# Altium PCB Watersensor.PcbDoc
Units mm, origin at the board's own origin, x right, y up, seen from the top; angles counter-clockwise.
Board outline 124.21 x 50.04 mm, 2 copper layers (Top Layer, Bottom Layer); 22 components, 15 nets, 108 pads, 8 vias.
Unrouted connection lines stored in the file: 11.
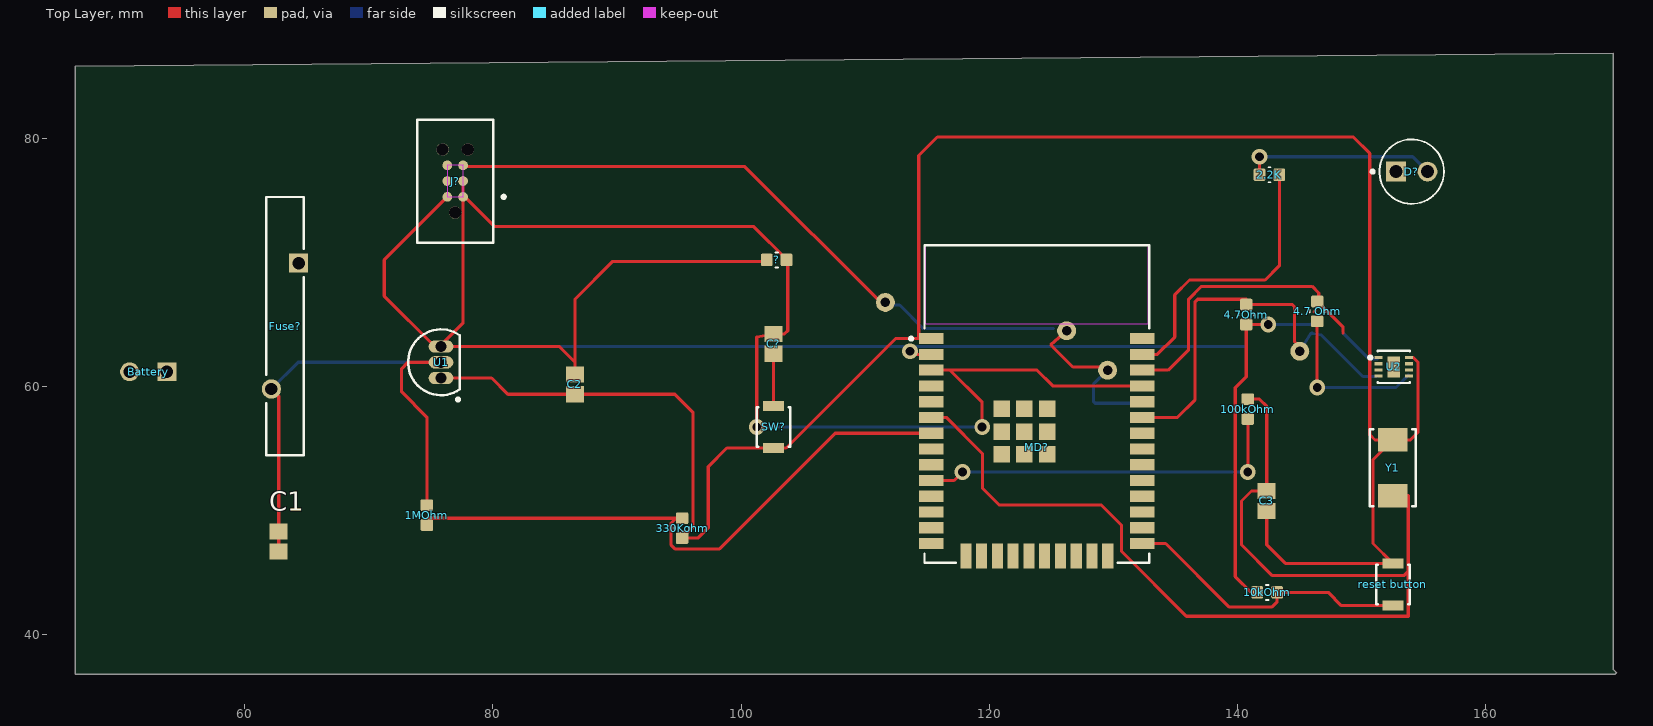
[diagram p0: Top Layer view]
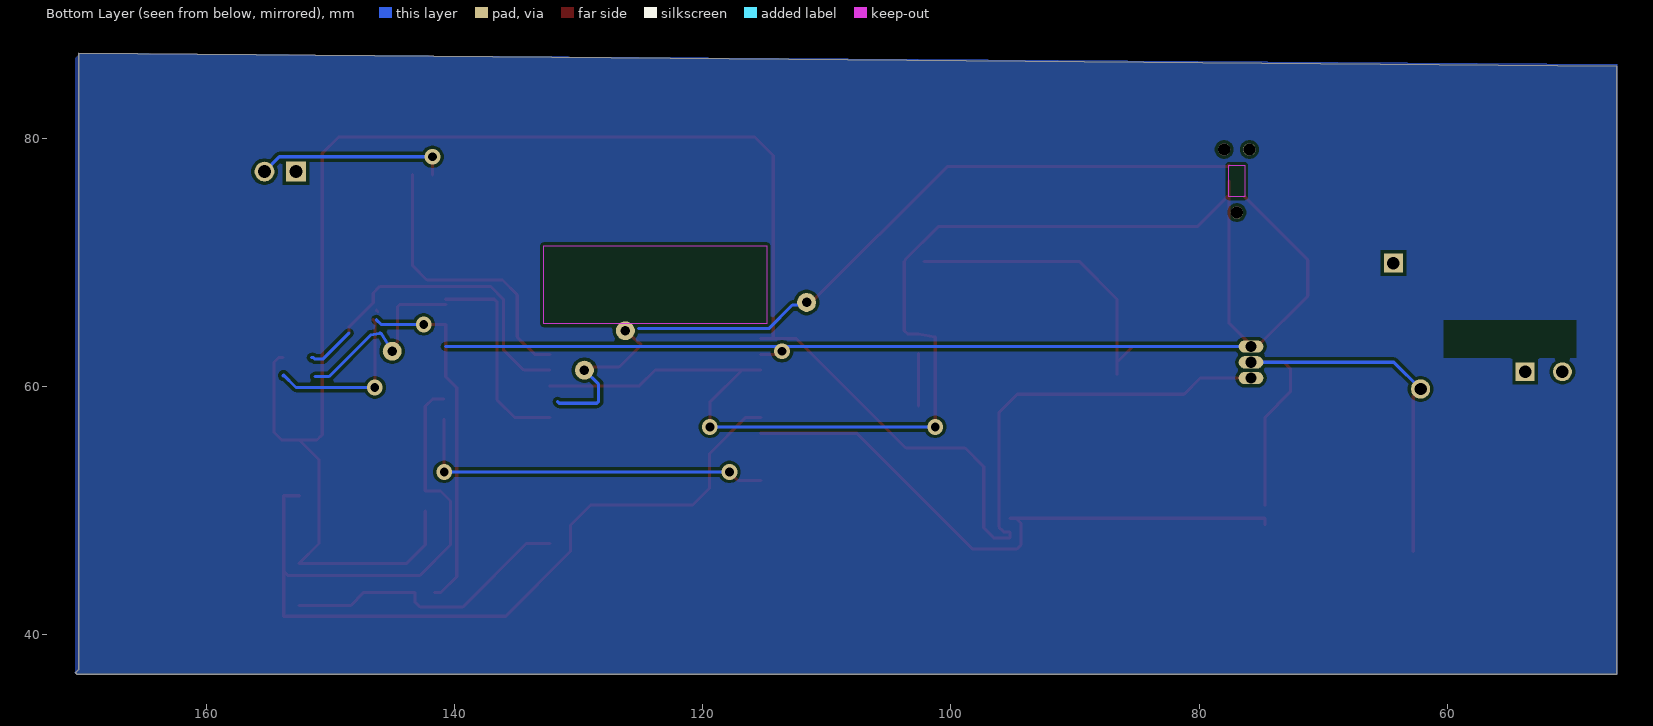
[diagram p1: Bottom Layer view, seen from below]
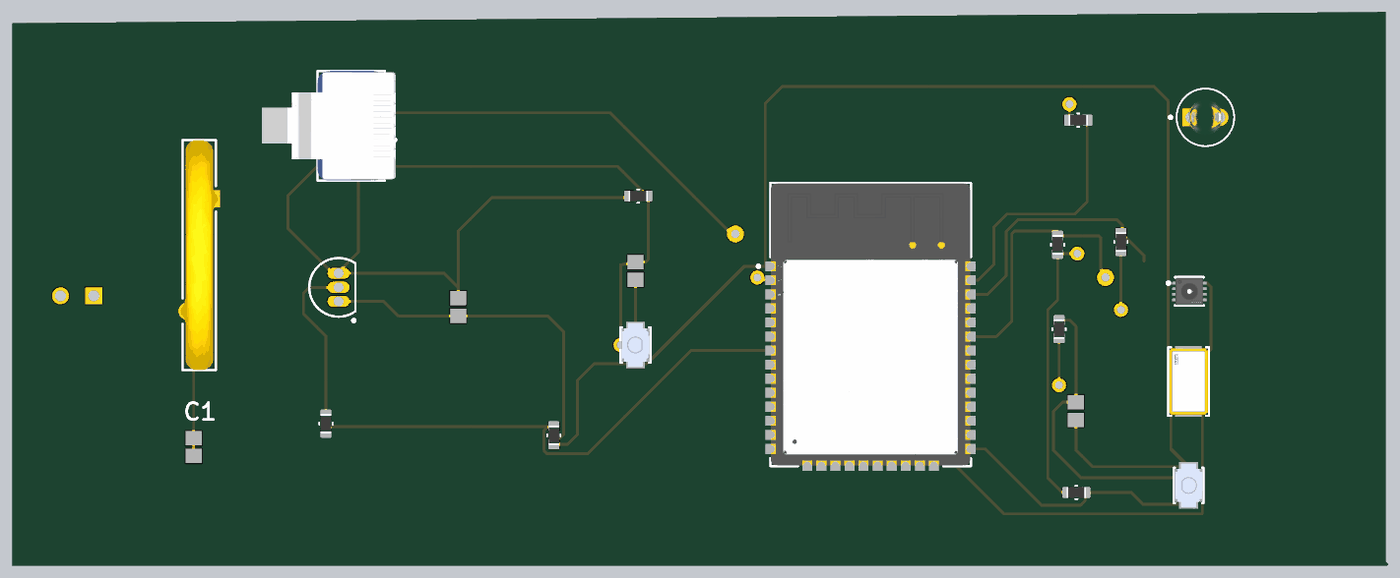
[diagram p2: 3D render of the assembled board from above, using the file's embedded part models]

## Layer stack, top to bottom
Top Solder: solder mask 0.0102, Solder Resist, Dk 3.5
Top Layer: signal copper 0.0356
Dielectric 1: dielectric 0.32, FR-4, Dk 4.8
Bottom Layer: signal copper 0.0356
Bottom Solder: solder mask 0.0102, Solder Resist, Dk 3.5

## Board outline
46.355,85.852 46.355,36.83 170.434,36.83 170.561,36.957 170.307,37.211 170.307,86.868

## Design rules (kind name [scope] priority, off if disabled: settings)
Clearance [All] p1: gap=0.254 ignorepadtopadclearanceinfootprint=FALSE
PolygonConnect [All] p1: connectstyle=Relief reliefconductorwidth=0.254 reliefentries=4 polygonreliefangle="90 Angle" airgapwidth=0.254
RoutingVias [All] p1: holewidth=0.711 width=1.27 viastyle="Through Hole" minholewidth=0.711 minwidth=1.27 maxholewidth=0.711 maxwidth=1.27
SolderMaskExpansion [All] p1: expansion=0.102 istentingtop=FALSE
SupplyNets "Schematic Supply Nets" [InNet('GND')] p1: voltage=0.000
Width [All] p1: maxlimit=0.254 minlimit=0.254 preferedwidth=0.254
30 further rules are at their usual default settings.

## Classes and differential pairs
component class Debug: J?

## Components (designator, comment, footprint, x,y, rotation, side; value= is the part's Value field where it differs from the comment)
1MOhm "" RESC_0603(1608)_020(0.5) 74.676,49.657 r90 top
2.2K "" RESC_0603(1608)_020(0.5) 142.583,77.089 r180 top
"4.7 Ohm" "" RESC_0603(1608)_020(0.5) 146.431,66.078 r90 top
4.7Ohm "" RESC_0603(1608)_020(0.5) 140.716,65.824 r90 top
10kOhm "" RESC_0603(1608)_020(0.5) 142.405,43.434 r180 top
100kOhm "" RESC_0603(1608)_020(0.5) 140.843,58.204 r270 top
330Kohm "" RESC_0603(1608)_020(0.5) 95.25,48.603 r90 top
? "" RESC_0603(1608)_020(0.5) 102.87,70.231 r180 top
Battery "Comment" BATTERY_2PIN 53.721,61.214 r0 top
C1 "1uf Capacitor" CAPC2013X140X50NL20T25 62.738,47.536 r90 top
C2 "1uf Capacitor" CAPC2013X140X50NL20T25 86.614,60.198 r90 top
C3 "1uf Capacitor" CAPC2013X140X50NL20T25 142.367,50.8 r90 top
C? "1uf" CAPC2013X140X50NL20T25 102.616,63.462 r90 top
D? "LED" FP-6_544-5255_01-4-MFG 154.051,77.343 r0 top
Fuse? "Fuse" FP-RXEF250-MFG 63.246,64.897 r270 top value=0.05-0.13Ω
J? "Debug" FP-TC2030-MCP-NL-MFG 76.962,76.581 r90 top
MD? "ESP32-WROOM-32" FP-ESP32-WROOM-32-MFG 123.834,58.621 r0 top
"reset button" "Reset Button" FP-B3U-1000P-MFG 152.527,44.069 r90 top
SW? "Reset Button" FP-B3U-1000P-MFG 102.616,56.769 r270 top
U1 "LDO" TO-92-TO3 75.819,61.976 r0 top
U2 "Humidity sensor" FP-SHT31-DIS-B2_5KS-MFG 152.609,61.607 r0 top
Y1 "Water detection" FP-ECX-64A-MFG 152.527,53.467 r90 top

## Footprints (in the part's own frame and the unit in brackets; to place one, negate y for a bottom-side part, rotate by r counter-clockwise, add the part's x,y. Pads: shape width x height; smd on the part's side, far side on the other; paste and mask are expansions set on the pad)
BATTERY_2PIN [mil] "2 PIN battery connection (GND/ BAT+) Li-ion 3.0 - 4.2V"
  rect 60x60 hole 39.37: 1(0,0)
  round 60 hole 39.37: 2(-118.11,0)
CAPC2013X140X50NL20T25 [mm] "Chip Capacitor, 2-Leads, Body 2.00x1.25mm, IPC Medium Density"
  rect 1.3x1.45 smd: 1(-0.8,0) 2(0.8,0)
  body extent -1.1,-0.72 1.1,0.72, height 1.4
FP-6_544-5255_01-4-MFG [mm]
  rect 1.6x1.6 hole 1.05 paste-2539.97 mask+0: 1(-1.27,0)
  round 1.6 hole 1.05 paste-2539.97 mask+0: 2(1.27,0)
  silkscreen extent -3.27,-2.6 2.6,2.6, body extent -2.32,-2.32 2.32,2.32, height 0.25
FP-B3U-1000P-MFG [mm]
  rect 0.8x1.7 smd paste+0 mask+0: 1(-1.7,0) 2(1.7,0)
  silkscreen extent -1.6,-1.35 1.6,1.35, body extent -2.2,-1.45 2.2,1.45, height 0.25
FP-ECX-64A-MFG [mm]
  rect 1.9x2.4 smd paste+0 mask+0: 1(-2.25,0) 2(2.25,0)
  silkscreen extent -3.1,-1.85 3.1,1.85, body extent -3.3,-1.95 3.3,1.95, height 0.25
FP-ESP32-WROOM-32-MFG [mm]
  rect 2x0.9 smd paste+0 mask+0: 1(-8.5,5.26) 2(-8.5,3.99) 3(-8.5,2.72) 4(-8.5,1.45) 5(-8.5,0.18) 6(-8.5,-1.09) 7(-8.5,-2.36) 8(-8.5,-3.63) 9(-8.5,-4.9) 10(-8.5,-6.17) 11(-8.5,-7.44) 12(-8.5,-8.71) 13(-8.5,-9.98) 14(-8.5,-11.25) 25(8.5,-11.25) 26(8.5,-9.98) 27(8.5,-8.71) 28(8.5,-7.44) 29(8.5,-6.17) 30(8.5,-4.9) 31(8.5,-3.63) 32(8.5,-2.36) 33(8.5,-1.09) 34(8.5,0.18) 35(8.5,1.45) 36(8.5,2.72) 37(8.5,3.99) 38(8.5,5.26)
  rect 0.9x2 smd paste+0 mask+0: 15(-5.715,-12.25) 16(-4.445,-12.25) 17(-3.175,-12.25) 18(-1.905,-12.25) 19(-0.635,-12.25) 20(0.635,-12.25) 21(1.905,-12.25) 22(3.175,-12.25) 23(4.445,-12.25) 24(5.715,-12.25)
  rect 1.33x1.33 smd paste+0 mask+0: 39(-2.835,-4.075) 39(-2.835,-2.24) 39(-2.835,-0.405) 39(-1,-4.075) 39(-1,-2.24) 39(-1,-0.405) 39(0.835,-4.075) 39(0.835,-2.24) 39(0.835,-0.405)
  Keep-Out Layer region: -9,6.45 9,6.45 9,12.75 -9,12.75
  Keep-Out Layer region: -9,6.45 9,6.45 9,12.75 -9,12.75
  silkscreen extent -10.25,-12.8 9.05,12.8, body extent -9.6,-13.35 9.6,12.9, height 0.25
FP-RXEF250-MFG [mm]
  rect 1.55x1.55 hole 1 paste-2539.97 mask+0: 1(-5.075,1.095)
  round 1.55 hole 1 paste-2539.97 mask+0: 2(5.075,-1.095)
  silkscreen extent -10.4,-1.5 10.4,1.5, body extent -10.5,-1.97 10.5,1.97, height 0.25
FP-SHT31-DIS-B2_5KS-MFG [mm]
  rect 0.65x0.25 smd paste-1000 mask+0: 1(-1.225,0.75) 2(-1.225,0.25) 3(-1.225,-0.25) 4(-1.225,-0.75) 5(1.225,-0.75) 6(1.225,-0.25) 7(1.225,0.25) 8(1.225,0.75)
  rect 1x1.7 smd paste-1000 mask+0: 9(0,0)
  silkscreen extent -2.02,-1.3 1.3,1.3, body extent -1.65,-1.4 1.65,1.4, height 0.25
FP-TC2030-MCP-NL-MFG [mil]
  round 30.98 smd paste-39370.1 mask+0: 1(-50,-25) 2(-50,25) 3(0,-25) 4(0,25) 5(50,-25) 6(50,25)
  round 39.02 hole 39.02 unplated paste-99999 mask+0: ""(-100,0) ""(100,-40) ""(100,40)
  Keep-Out Layer region: -50,-25 50,-25 50,25 -50,25
  silkscreen extent -195,-159 195,120, body extent -199,-124 199,124, height 10
RESC_0603(1608)_020(0.5) [mm] "Resistor, 0603 (1608) x 020 (0.5)"
  rrect25% 0.95x1 smd mask+0.05: 1(-0.8,0) 2(0.8,0)
  silkscreen extent -0.1,-0.6 0.1,0.6, body extent -0.87,-0.48 0.87,0.48, height 0.5
TO-92-TO3 [mm] "TO, Flat Index; 3 In-Line, Axial Leads; Body Dia. 4.8mm; Leads 0.56 x 0.53 mm (max)"
  oval 2x1 hole 0.9: 1(0,-1.27) 2(0,0) 3(0,1.27)
  silkscreen extent -2.65,-3.13 1.52,2.65, body extent -2.65,-2.66 1.52,2.66, height 5.33

## Part data
1MOhm 2.2K "4.7 Ohm" 4.7Ohm 10kOhm 100kOhm 330Kohm ?: library part CMP-00408-1, "Resistor, 1 kOhm, 1%, 1/10W, 0603", Case=0603, Manufacturer=Various, Max Temperature=155°C, Min Temperature=-55°C, Power=100mW, Resistance=1k, Tolerance=1%, AEC-Q200=Y, Composition="Thin Film", Features="Automotive AEC-Q200", Height=500µm, Mounting=SMT
C1 C2 C3 C?: library part CMP-2007-04663-1, Manufacturer="AVX Interconnect / Elco", Part Number=0805YD105MAT2A
D?: library part CMP-02520-000017-1, "LED GREEN DIFFUSED T-1 T/H", Case/Package=T, Color=Green, Forward Current=7mA, Forward Voltage=2.4V, Max Operating Temperature=100°C, Min Operating Temperature=-40°C, Power Dissipation=20mW, Reverse Voltage=20V, Test Current=2mA, Depth=3.2mm, Dominant Wavelength=575nm, Length=3.2mm, Lens Style=Diffused, Luminous Intensity=2mcd, Mount="Through Hole", Number of Elements=1, Number of LEDs=1, Number of Pins=2, Packaging="Tape and Reel", Radiation Hardening=No, RoHS Compliant=No, Viewing Angle=50°
Fuse?: library part CMP-08606-000004-1, "PTC RESET FUSE 72V 2.5A RADIAL", Ambient Temperature Range High=+85°C, Ambient Temperature Range Low=-40°C, Current Rating=40A, Hold Current=2.5A, Manufacturer=Littelfuse, Manufacturer Part Number=RXEF250, Package=0, Resistance=0.05-0.13Ω, Temperature="-40°C to +85°C", Trip Current=5A, Voltage Rating=72V, Automotive=No, Category=Fuse, ComponentLink2Description=Datasheet, ComponentLink2URL=https://www.littelfuse.com/~/media/electronics/datasheets/resettable_ptcs/littelfuse_ptc_radial_leaded_rxef_datasheet.pdf.pdf, Device Class L1="Circuit Protection", Device Class L2="PTC Resettable Fuses", Device Class L3=unset, Digikey Description="PTC RESET FUSE 72V 2.5A RADIAL", Height=25.4mm, Lead Free=Yes, Octopart=https://octopart.com/rxef250-littelfuse-74215928, RoHS=TRUE, Temperature Range High=+85°C, Temperature Range Low=-40°C, Trip Time=15.6s
J?: library part CMP-205963-000002-1, "CABLE TAG-CONNECT IN-CIRCUIT", Package Quantity=1, Lead Free="Lead Free", Reach SVHC Compliant=Yes, RoHS Compliant=Yes, Series=-
MD?: library part CMP-194065-000008-1, "RX TXRX MOD WIFI SURFACE MOUNT", Case/Package=SMD/SMT, Frequency=2.5GHz, Max Operating Temperature=85°C, Min Operating Temperature=-40°C, Operating Supply Voltage=3.6V, Package Quantity=550, Data Rate=150Mbps, Mount="Surface Mount", Packaging="Cut Tape", Sensitivity=-98dBm, Weight=0.088185oz
"reset button" SW?: library part CMP-2100-03586-2, "SWITCH TACTILE SPST-NO 0.05A 12V", Contact Current Rating=50mA, Contact Resistance=100mR, Insulation Resistance=100MR, Max Operating Temperature=70°C, Max Voltage Rating (DC)=12V, Min Operating Temperature=-25°C, Operating Force=1.5N, Package Quantity=1, Ratings="Dust Proof", Actuator Length=0.4mm, Actuator Type=Standard, Contact Material=Silver, Current Rating=50mA, Depth=2.5mm, Electrical Life=200000Cycles, Height=1.2mm, Illumination Type=Non-Illuminated, Lead Free="Lead Free", Length=4mm, Max Current Rating=50mA, Mechanical Life=200000Cycles, Mount="Surface Mount", Orientation=Straight, Packaging="Tape and Reel", Switch Function=Off-Mom, Switch Travel=0.15mm, Termination=SMD/SMT, Throw Configuration=SPST, Voltage Rating (DC)=12V, Weight=0.000776oz, Width=3mm
U1: library part CMP-0136-00007-1, "Low Quiescent Current LDO, 3-Pin TO-92, Extended TemperatureBAG", DatasheetVersion="revB, Feb-2007", PackageDescription="3-Lead Plastic Transistor Outline (TO) [TO-92]", PackageReference=TO-92-TO3, PackageVersion="revBB, Aug-2009"
U2: library part CMP-144040-000009-1, "SENSOR HUMID/TEMP 5V I2C 2% SMD", RoHS Compliant=Yes
Y1: library part CMP-40224-000026-1, "CRYSTAL 25.0000MHZ 18PF SMD", Case/Package=SMD/SMT, ESR (Equivalent Series Resistance)=40R, Frequency=25MHz, Frequency Stability=30ppm, Frequency Tolerance=20ppm, Load Capacitance=18pF, Max Operating Temperature=85°C, Min Operating Temperature=-40°C, Height=0.043inch, Length=0.236inch, Mount="Surface Mount", Packaging="Cut Tape", Width=0.138inch

## Free pads (board coordinates)
  round 1.524 hole 0.762: 2(145.034,62.865) 3(111.633,66.802) 4(126.238,64.516) 5(129.54,61.341)

## Via types
v1: diameter 1.27, hole 0.711, Top Layer to Bottom Layer, 8 vias

## Nets (pads, with @x,y where several pads share a name; then routed paths per layer and width w, separated by ;. In a path a pad name is that pad's centre, name@x,y a point inside that pad or via, vN(x,y) a via of type N, cw(c..) or ccw(c..) an arc to the next point about the centre after c; other vN are vias at no path point)
GND: 330Kohm.1 "reset button.2" C2.1 C3.1 J?.3 MD?.1 SW?.2 U1.1 U2.7 U2.8 Y1.2 | length 186.2
  Top Layer w0.254: U1.1 79.896,60.706 81.204,59.398 C2.1 94.653,59.398 96.139,57.912 96.139,48.692 95.758,48.311 95.25,48.311 330Kohm.1 96.52,47.803 97.358,48.641 97.358,53.569 98.859,55.069 SW?.2 103.632,55.069 112.444,63.881 114.325,63.881 ; 75.946,63.5 77.597,65.151 J?.3 ; MD?.1 114.325,63.881 ; C3.1 142.367,47.269 143.867,45.769 152.527,45.769 150.927,47.369 150.927,54.117 Y1.2 ; U2.8 154.178,62.357 154.559,61.976 154.559,56.337 153.939,55.717 Y1.2 ; 114.325,63.881 114.325,78.638 115.824,80.137 149.352,80.137 150.673,78.816 150.673,56.134 151.09,55.717 Y1.2
Net1MOhm_2: 1MOhm.2 C1.1 C1.2 Fuse?.2 U1.2 | length 43.1
  Top Layer w0.254: Fuse?.2 62.738,59.235 C1.2 C1.1 ; 1MOhm.2 74.676,57.556 72.644,59.588 72.644,61.468 73.152,61.976 U1.2
  Bottom Layer w0.254: Fuse?.2 64.305,61.976 U1.2
Net2.2K_1: 2.2K.1 MD?.37 | length 23.3
  Top Layer w0.254: MD?.37 133.553,62.611 134.95,64.008 134.95,67.412 136.144,68.605 142.24,68.605 143.383,69.748 2.2K.1
Net2.2K_2: 2.2K.2 D?.2 | length 15.5
  Top Layer w0.254: 2.2K.2 v1(141.783,78.537)
  Bottom Layer w0.254: v1(141.783,78.537) 154.127,78.537 D?.2
"Net4.7 Ohm_1": 4.7Ohm.1 10kOhm.2 "4.7 Ohm.1" ?.2 C2.2 J?.2 MD?.2 U1.3 U2.5 | length 160
  Top Layer w0.254: J?.2 71.247,70.231 71.247,67.31 75.311,63.246 U1.3 85.344,63.246 86.614,61.976 ; C2.2 86.614,61.976 ; ?.2@102.159,70.104 102.07,70.104 89.662,70.104 86.614,67.056 86.614,61.976 ; v1(113.614,62.865) 113.868,62.611 MD?.2 ; 10kOhm.2 141.097,43.434 139.827,44.704 139.827,59.919 140.716,60.808 4.7Ohm.1 v1(142.494,65.024) ; v1(146.431,59.944) 146.431,65.278 146.558,65.405
  Bottom Layer w0.254: U1.3 v1@113.233,63.246 ; v1(113.614,62.865) v1@113.233,63.246 ; 140.716,63.246 v1@113.233,63.246 ; v1(142.494,65.024) 145.923,65.024 146.304,65.405 ; v1(146.431,59.944) 152.781,59.944 153.797,60.96 153.834,60.857
"Net4.7 Ohm_2": "4.7 Ohm.2" MD?.36 U2.1 | length 27.6
  Top Layer w0.254: MD?.36 134.417,61.341 136.068,62.992 136.068,67.056 137.109,68.097 146.025,68.097 146.558,67.564 146.558,66.776 148.523,64.811 148.523,64.329
  Bottom Layer w0.254: 148.523,64.329 150.622,62.23 151.257,62.23 151.384,62.357 151.511,62.357
Net4.7Ohm_2: 4.7Ohm.2 MD?.33 pad.2 U2.4 | length 33.1
  Top Layer w0.254: MD?.33 135.179,57.531 136.576,58.928 136.576,66.827 136.804,67.056 4.7Ohm.2@140.716,67.056 ; 4.7Ohm.2 144.443,66.624 144.592,66.475 144.592,63.649 145.034,63.207 pad.2
  Bottom Layer w0.254: pad.2 145.918,64.288 145.968,64.31 146.045,64.31 146.772,64.175 150.114,60.833 151.257,60.833
Net10kOhm_1: 10kOhm.1 "reset button.1" MD?.25 | length 23.7
  Top Layer w0.254: MD?.25 134.214,47.371 139.319,42.266 142.799,42.266 143.205,42.672 10kOhm.1 147.32,43.434 148.385,42.369 152.527,42.369
Net100kOhm_1: 100kOhm.1 C3.2 MD?.6 Y1.1 | length 88
  Top Layer w0.254: MD?.6 116.535,57.531 119.456,54.61 119.456,51.816 120.802,50.47 129.032,50.47 130.658,48.844 130.658,46.736 135.89,41.504 153.772,41.504 153.772,45.136 ; 100kOhm.1 141.783,59.004 142.367,58.42 C3.2 141.135,51.6 140.335,50.8 140.335,47.269 142.824,44.78 153.416,44.78 153.772,45.136 ; Y1.1 153.772,51.217 153.772,45.136
Net100kOhm_2: 100kOhm.2 MD?.10 | length 30.1
  Top Layer w0.254: MD?.10 117.17,52.451 v1(117.856,53.137) ; v1(140.843,53.137) 100kOhm.2
  Bottom Layer w0.254: v1(117.856,53.137) v1(140.843,53.137)
Net*_1: Fuse?.1
Net?_1: ?.1 C?.2 J?.1 J?.4 MD?.3 MD?.35 | length 85
  Top Layer w0.254: J?.1 77.741,75.311 80.146,72.906 101.02,72.906 103.67,70.256 ?.1 ; v1(101.27,56.769) 101.27,64.008 C?.2 103.505,64.262 103.759,64.516 ?.1@103.759,70.104 ; MD?.3 116.84,61.341 ; v1(119.431,56.769) 119.431,58.75 116.84,61.341 ; MD?.35 125.12,60.071 123.85,61.341 116.84,61.341
  Bottom Layer w0.254: v1(101.27,56.769) v1(119.431,56.769)
NetC?_1: C?.1 SW?.1 | length 4.2
  Top Layer w0.254: SW?.1 C?.1
NetJ?_5: J?.5 MD?.34 pad.3 pad.4 pad.5 | length 65.9
  Top Layer w0.254: J?.5 77.699,77.749 100.305,77.749 pad.3@111.252,66.802 ; pad.4 124.968,63.373 126.746,61.595 pad.5@129.413,61.595
  Bottom Layer w0.254: pad.3 111.845,66.59 112.776,66.59 114.676,64.69 125.175,64.69 ; pad.5 128.397,60.198 128.397,58.823 128.546,58.674 131.572,58.674 131.699,58.801
"Voltage Measurement": 1MOhm.1 330Kohm.2 MD?.7 | length 48.4
  Top Layer w0.254: 1MOhm.1 74.676,49.403 94.742,49.403 ; 330Kohm.2 94.742,49.403 ; MD?.7 107.594,56.261 98.273,46.939 94.666,46.939 94.361,47.244 94.361,49.022 94.742,49.403
pads on no net: Battery.1 Battery.2 D?.1 J?. J?.6 MD?.4 MD?.5 MD?.8 MD?.9 MD?.11 MD?.12 MD?.13 MD?.14 MD?.15 MD?.16 MD?.17 MD?.18 MD?.19 MD?.20 MD?.21 MD?.22 MD?.23 MD?.24 MD?.26 MD?.27 MD?.28 MD?.29 MD?.30 MD?.31 MD?.32 MD?.38 MD?.39 U2.2 U2.3 U2.6 U2.9
copper on no net: | length 0.2
  Top Layer w0.254: 146.177,66.04 146.304,66.167

## Polygon pours and split planes (outlines as drawn)
no net on Bottom Layer "NONET_L02_P004" (solid, pour order 4): 46.355,85.979 46.355,36.83 170.434,36.83 170.561,36.957 170.307,37.211 170.307,86.868
no net on Bottom Layer "NONET_L02_P003" (solid, pour order 3): 43.434,61.341 42.926,61.341 42.672,61.087
no net on Bottom Layer "NONET_L02_P002" (solid, pour order 2): 46.355,85.979 46.355,36.83 46.482,36.957 170.561,36.957 170.561,86.487 170.18,86.868 170.307,86.868